# Altium PCB PCB2.PcbDoc
Units mm, origin at the board's own origin, x right, y up, seen from the top; angles counter-clockwise.
Board outline 29.77 x 25.83 mm, 2 copper layers (Top Layer, Bottom Layer); 49 components, 39 nets, 176 pads, 61 vias.
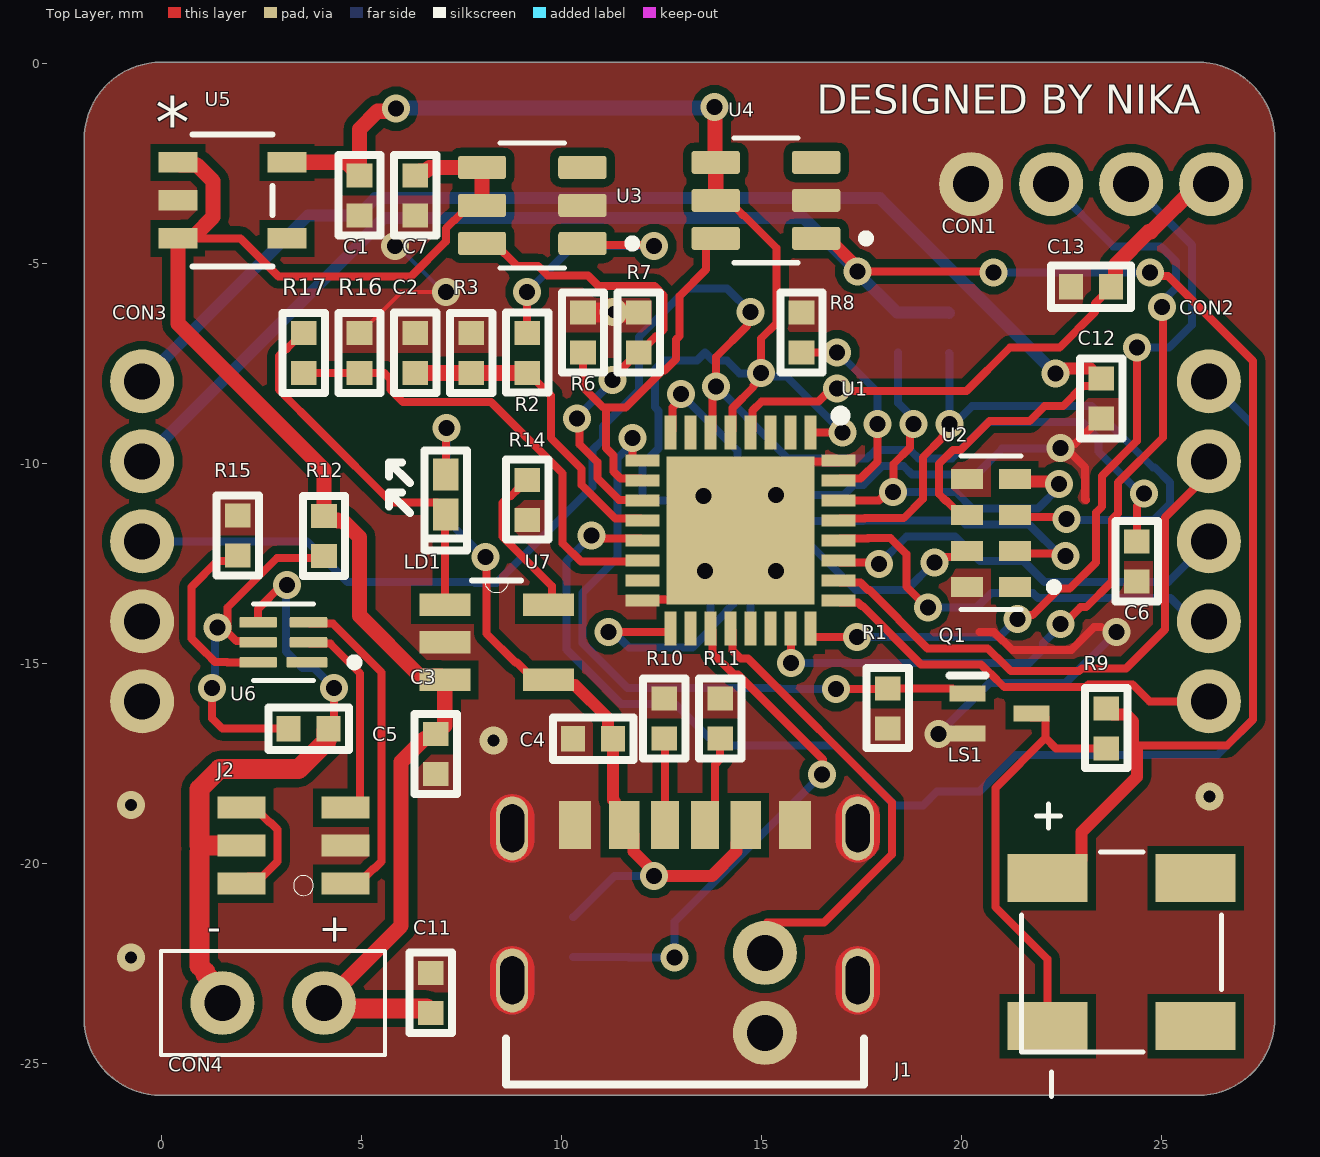
[diagram p0: Top Layer view]
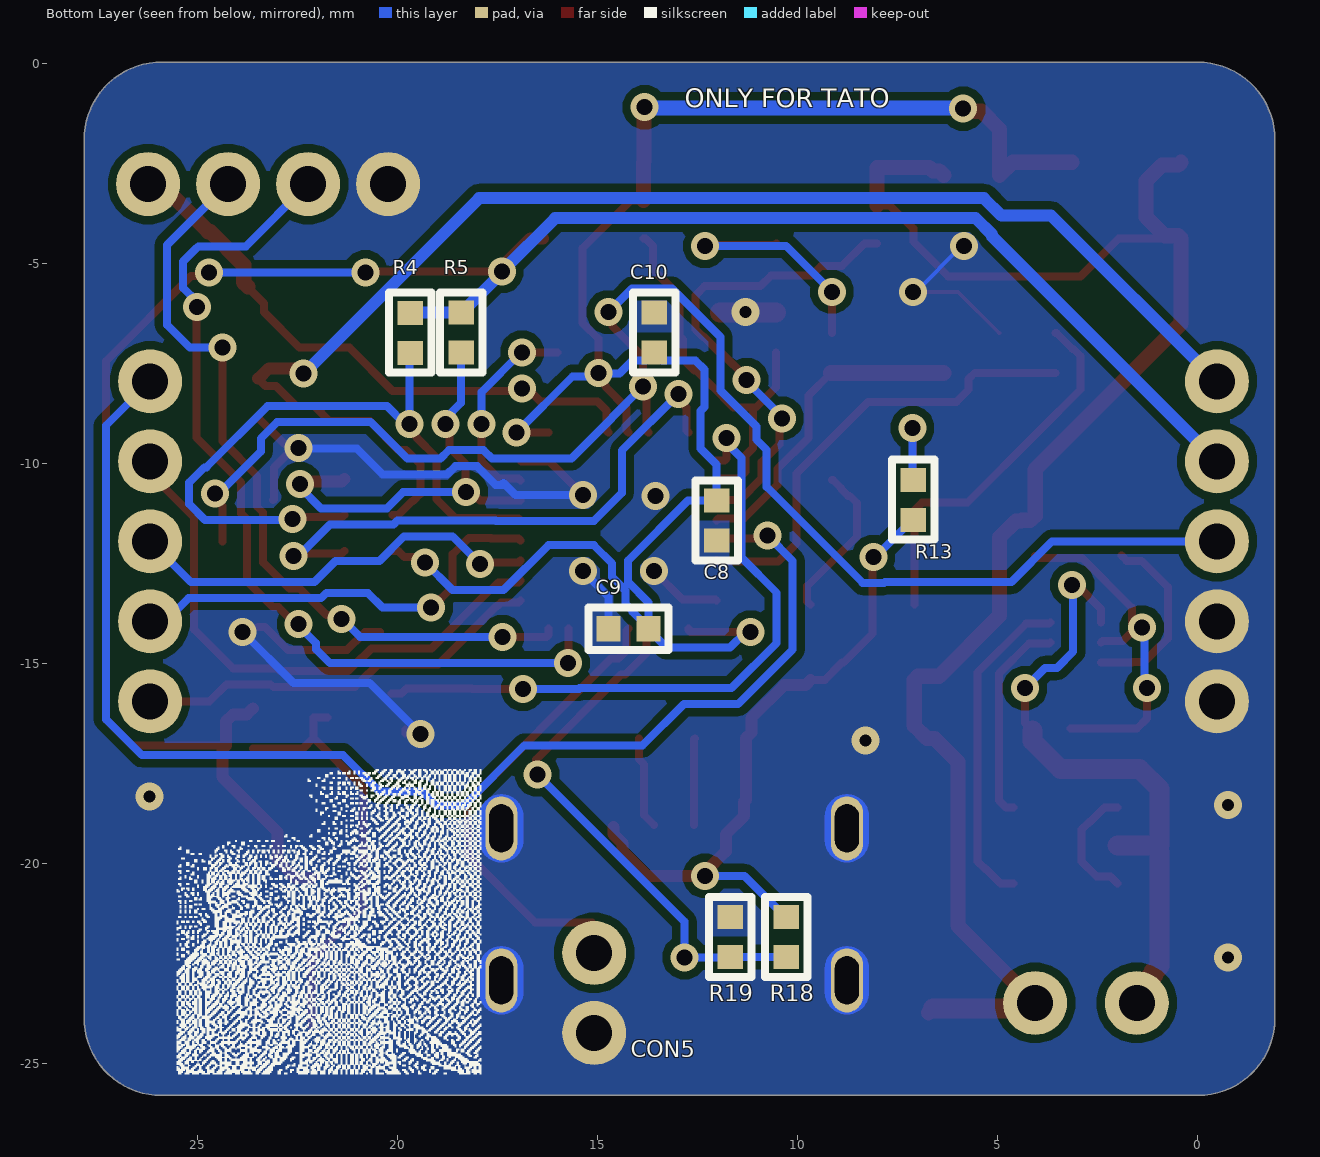
[diagram p1: Bottom Layer view, seen from below]

## Layer stack, top to bottom
Top Solder: solder mask 0.0102, Solder Resist, Dk 3.5
Top Layer: signal copper 0.0356
Dielectric 1: dielectric 0.32, FR-4, Dk 4.8
Bottom Layer: signal copper 0.0356
Bottom Solder: solder mask 0.0102, Solder Resist, Dk 3.5

## Board outline
-1.93,-23.876 ccw(c0,-23.876) 0,-25.806 25.908,-25.806 ccw(c25.908,-23.876) 27.833,-24.018 27.838,-24.003 27.838,-1.778 27.833,-1.763 ccw(c25.908,-1.905) 26.05,0.02 26.035,0.025 0,0.025 ccw(c0,-1.905) -1.93,-1.905

## Design rules (kind name [scope] priority, off if disabled: settings)
Clearance [All] p1: gap=0.2 ignorepadtopadclearanceinfootprint=TRUE
MinimumSolderMaskSliver [All] p1: minsoldermaskwidth=0.05
PolygonConnect [All] p1: connectstyle=Direct reliefconductorwidth=0.254 reliefentries=4 polygonreliefangle="90 Angle" airgapwidth=0.254
RoutingVias [All] p1: holewidth=0.7 width=1 viastyle="Through Hole" minholewidth=0.3 minwidth=0.7 maxholewidth=0.7 maxwidth=1
SilkToSilkClearance [All] p1 off: silktosilkclearance=0.254
SilkToSolderMaskClearance [IsPad] p1 off: minsilkscreentomaskgap=0.254 clearancetoexposedcopper=TRUE
SolderMaskExpansion [All] p1: expansion=0 istentingtop=FALSE
SupplyNets "Schematic Supply Nets_1" [InNet('+3')] p1: voltage=0.000
SupplyNets "Schematic Supply Nets" [InNet('GND')] p2: voltage=0.000
Width [All] p1: maxlimit=0.6 minlimit=0.1 preferedwidth=0.2
27 further rules are at their usual default settings.

## Classes and differential pairs
component class Sheet2: C4 C5 C11 CON4 J1 J2 LD1 R10 R11 R12 R13 R14 R15 R16 R17 R18 R19 U6 U7
component class Sheet1: 3 C1 C2 C3 C6 C7 C8 C9 C10 C12 C13 CON1 CON2 CON3 CON5 LS1 Q1 R1 R2 R3 R4 R5 R6 R7 R8 R9 U1 U2 U3 U4 U5

## Components (designator, comment, footprint, x,y, rotation, side; value= is the part's Value field where it differs from the comment)
C1 "CAP_0402" CAP_0402 4.953,-3.302 r90 top
C2 "CAP_0402" CAP_0402 6.35,-7.239 r270 top
C3 "CAP_0402" CAP_0402 6.858,-17.272 r90 top
C4 "CAP_0402" CAP_0402 10.795,-16.891 r0 top
C5 "CAP_0402" CAP_0402 3.683,-16.637 r180 top
C6 "CAP_0402" CAP_0402 24.384,-12.454 r90 top
C7 "CAP_0402" CAP_0402 6.35,-3.302 r90 top
C8 "CAP_0402" CAP_0402 12.028,-11.434 r90 bottom
C9 "CAP_0402" CAP_0402 14.228,-14.134 r0 bottom
C10 "CAP_0402" CAP_0402 13.589,-6.731 r90 bottom
C11 "CAP_0402" CAP_0402 6.731,-23.241 r90 top
C12 "CAP_0402" CAP_0402 23.495,-8.382 r270 top
C13 "CAP_0402" CAP_0402 23.241,-5.588 r180 top
CON1 "CON_1x4_2mm" CON_1x4_2mm 23.241,-3.048 r90 top
CON2 "CON_1x6_2mm" CON_1x5_2mm 26.214,-12.953 r0 top
CON3 "CON_1x6_2mm" CON_1x5_2mm -0.456,-12.953 r0 top
CON4 "1x4 2.54mm THT" CON_1x2_2.54MM_THT 2.794,-23.495 r270 top
CON5 "1x4 2.54mm THT" CON_1x2_2mm 15.113,-23.241 r180 bottom
J1 "USB4125-GF-A_REVA2" GCT_USB4125-GF-A_REVA2 13.089,-22.13 r0 top
J2 "FDC6305N" SSOT-6 3.302,-19.558 r90 top
LD1 "LED_0402" LED_0402 7.112,-10.787 r90 top
LS1 "Buzzer_Capacitive_5020" Buzzer_5020 24.003,-22.225 r270 top
Q1 "c" SOT50P160X80-3N 20.955,-16.256 r0 top
R1 "RES_0402" RES_0402 18.161,-16.129 r90 top
R2 "RES_0402" RES_0402 9.144,-7.239 r90 top
R3 "RES_0402" RES_0402 7.747,-7.239 r270 top
R4 "RES_0402" RES_0402 19.685,-6.739 r90 bottom
R5 "RES_0402" RES_0402 18.415,-6.731 r90 bottom
R6 "RES_0402" RES_0402 10.541,-6.731 r270 top
R7 "RES_0402" RES_0402 11.938,-6.731 r270 top
R8 "RES_0402" RES_0402 16.002,-6.731 r270 top
R9 "RES_0402" RES_0402 23.622,-16.629 r90 top
R10 "RES_0402" RES_0402 12.573,-16.383 r270 top
R11 "RES_0402" RES_0402 13.97,-16.383 r270 top
R12 "RES_0402" RES_0402 4.064,-11.819 r90 top
R13 "RES_0402" RES_0402 7.112,-10.914 r90 bottom
R14 "RES_0402" RES_0402 9.144,-10.914 r90 top
R15 "RES_0402" RES_0402 1.905,-11.811 r90 top
R16 "RES_0402" RES_0402 4.953,-7.239 r270 top
R17 "RES_0402" RES_0402 3.556,-7.239 r270 top
R18 "RES_0402" RES_0402 10.287,-21.844 r90 bottom
R19 "RES_0402" RES_0402 11.684,-21.844 r270 bottom
U1 "STM32U031K8U6" QFN50P500X500X60-33N-D 14.478,-11.684 r270 top
U2 "RV-3028-C7-32.768KHZ" "IC_RV-3028-C7-32.768KHZ-1PPM-TA-QA - duplicate" 20.736,-11.742 r180 top
U3 "TPS22860DBVR" SOT95P280X145-6N 9.271,-3.556 r180 top
U4 "TPS22860DBVR" SOT95P280X145-6N 15.113,-3.429 r180 top
U5 "TPS7A0230PDBVR" SOT23_DBV_TEX 1.778,-3.429 r0 top
U6 "BQ29700DSER" SON50P150X150X80-6N 3.048,-14.478 r180 top
U7 "MCP73831T-2ACI/OT" SOT95P280X145-5N 8.382,-14.478 r0 top

## Footprints (in the part's own frame and the unit in brackets; to place one, negate y for a bottom-side part, rotate by r counter-clockwise, add the part's x,y. Pads: shape width x height; smd on the part's side, far side on the other; paste and mask are expansions set on the pad)
Buzzer_5020 [mm]
  rect 1.2x2 smd paste+0 mask+0.102: N(1.85,-1.85) NC(-1.85,1.85) NC(1.85,1.85) P(-1.85,-1.85)
  silkscreen extent -3.7,-2.5 3.6,2.5, body extent -2.5,-1.58 2.5,3.42, height 0.75
CAP_0402 [mm] "Chip Capacitor, 2-Leads, Body 1,06x0,51mm, IPC Medium Density"
  rect 0.6x0.64 smd: 1(-0.5,0) 2(0.5,0)
  silkscreen extent -1,-0.53 1,0.53, body extent -0.55,-0.26 0.55,0.25, height 0.5
CON_1x2_2.54MM_THT [mm] "Chip Resistor, 2-Leads, Body 5,20x3,30mm, IPC Medium Density"
  round 1.6 hole 0.9: 1(0,1.27) 2(0,-1.27)
  silkscreen extent -1.3,-2.8 1.3,2.8, body extent -1,-2.5 1,2.5, height 6.3
CON_1x2_2mm [mm]
  round 1.6 hole 0.9: 1(0.025,1) 2(0.025,-1)
  body extent -0.97,-1.91 1.03,1.91, height 6.3
CON_1x4_2mm [mm]
  round 1.6 hole 0.9: 1(0.025,3) 2(0.025,1) 3(0.025,-1) 4(0.025,-3)
  body extent -0.97,-4.03 1.03,4.1, height 6.3
CON_1x5_2mm [mm]
  round 1.6 hole 0.9: 1(-0.025,5) 2(-0.025,3) 3(-0.025,1) 4(-0.025,-1) 5(-0.025,-3)
  body extent -1.02,-4.23 0.98,6.1, height 6.3
GCT_USB4125-GF-A_REVA2 [mm]
  rect 0.7x1.2 smd: A5(-0.5,3.08) B5(0.5,3.08)
  rect 0.76x1.2 smd: A9(1.52,3.08) B9(-1.52,3.08)
  rect 0.8x1.2 smd: A12(2.75,3.08) B12(-2.75,3.08)
  oval 0.8x1.6 hole 0.6 slot 1.2 at 90 deg mask+0: S1(-4.32,3) S2(4.32,3) S3(-4.32,-0.8) S4(4.32,-0.8)
  Top Layer region: -4.291,0.049 -4.263,0.047 -4.234,0.043 -4.206,0.038 -4.178,0.031 -4.15,0.023 -4.123,0.013 -4.096,0.002 -4.07,-0.01 -4.045,-0.024 -4.02,-0.039 -3.997,-0.055 -3.974,-0.073 -3.952,-0.091 -3.931,-0.111 -3.911,-0.132 -3.893,-0.154 -3.875,-0.177 -3.859,-0.2 -3.844,-0.225 -3.83,-0.25 -3.818,-0.276 -3.807,-0.303 -3.797,-0.33 -3.789,-0.358 -3.782,-0.386 -3.777,-0.414 -3.773,-0.443 -3.771,-0.471 -3.77,-0.5 -3.77,-1.1 -3.771,-1.129 -3.773,-1.157 -3.777,-1.186 -3.782,-1.214 -3.789,-1.242 -3.797,-1.27 -3.807,-1.297 -3.818,-1.324 -3.83,-1.35 -3.844,-1.375 -3.859,-1.4 -3.875,-1.423 -3.893,-1.446 -3.911,-1.468 -3.931,-1.489 -3.952,-1.509 -3.974,-1.527 -3.997,-1.545 -4.02,-1.561 -4.045,-1.576 -4.07,-1.59 -4.096,-1.602 -4.123,-1.613 -4.15,-1.623 -4.178,-1.631 -4.206,-1.638 -4.234,-1.643 -4.263,-1.647 -4.291,-1.649 -4.32,-1.65 -4.349,-1.649 -4.377,-1.647 -4.406,-1.643 -4.434,-1.638 -4.462,-1.631 -4.49,-1.623 -4.517,-1.613 -4.544,-1.602 -4.57,-1.59 -4.595,-1.576 -4.62,-1.561 -4.643,-1.545 -4.666,-1.527 -4.688,-1.509 -4.709,-1.489 -4.729,-1.468 -4.747,-1.446 -4.765,-1.423 -4.781,-1.4 -4.796,-1.375 -4.81,-1.35 -4.822,-1.324 -4.833,-1.297 -4.843,-1.27 -4.851,-1.242 -4.858,-1.214 -4.863,-1.186 -4.867,-1.157 -4.869,-1.129 -4.87,-1.1 -4.87,-0.5 -4.869,-0.471 -4.867,-0.443 -4.863,-0.414 -4.858,-0.386 -4.851,-0.358 -4.843,-0.33 -4.833,-0.303 -4.822,-0.276 -4.81,-0.25 -4.796,-0.225 -4.781,-0.2 -4.765,-0.177 -4.747,-0.154 -4.729,-0.132 -4.709,-0.111 -4.688,-0.091 -4.666,-0.073 -4.643,-0.055 -4.62,-0.039 -4.595,-0.024 -4.57,-0.01 -4.544,0.002 -4.517,0.013 -4.49,0.023 -4.462,0.031 -4.434,0.038 -4.406,0.043 -4.377,0.047 -4.349,0.049 -4.32,0.05
  Top Layer region: 4.349,0.049 4.377,0.047 4.406,0.043 4.434,0.038 4.462,0.031 4.49,0.023 4.517,0.013 4.544,0.002 4.57,-0.01 4.595,-0.024 4.62,-0.039 4.643,-0.055 4.666,-0.073 4.688,-0.091 4.709,-0.111 4.729,-0.132 4.747,-0.154 4.765,-0.177 4.781,-0.2 4.796,-0.225 4.81,-0.25 4.822,-0.276 4.833,-0.303 4.843,-0.33 4.851,-0.358 4.858,-0.386 4.863,-0.414 4.867,-0.443 4.869,-0.471 4.87,-0.5 4.87,-1.1 4.869,-1.129 4.867,-1.157 4.863,-1.186 4.858,-1.214 4.851,-1.242 4.843,-1.27 4.833,-1.297 4.822,-1.324 4.81,-1.35 4.796,-1.375 4.781,-1.4 4.765,-1.423 4.747,-1.446 4.729,-1.468 4.709,-1.489 4.688,-1.509 4.666,-1.527 4.643,-1.545 4.62,-1.561 4.595,-1.576 4.57,-1.59 4.544,-1.602 4.517,-1.613 4.49,-1.623 4.462,-1.631 4.434,-1.638 4.406,-1.643 4.377,-1.647 4.349,-1.649 4.32,-1.65 4.291,-1.649 4.263,-1.647 4.234,-1.643 4.206,-1.638 4.178,-1.631 4.15,-1.623 4.123,-1.613 4.096,-1.602 4.07,-1.59 4.045,-1.576 4.02,-1.561 3.997,-1.545 3.974,-1.527 3.952,-1.509 3.931,-1.489 3.911,-1.468 3.893,-1.446 3.875,-1.423 3.859,-1.4 3.844,-1.375 3.83,-1.35 3.818,-1.324 3.807,-1.297 3.797,-1.27 3.789,-1.242 3.782,-1.214 3.777,-1.186 3.773,-1.157 3.771,-1.129 3.77,-1.1 3.77,-0.5 3.771,-0.471 3.773,-0.443 3.777,-0.414 3.782,-0.386 3.789,-0.358 3.797,-0.33 3.807,-0.303 3.818,-0.276 3.83,-0.25 3.844,-0.225 3.859,-0.2 3.875,-0.177 3.893,-0.154 3.911,-0.132 3.931,-0.111 3.952,-0.091 3.974,-0.073 3.997,-0.055 4.02,-0.039 4.045,-0.024 4.07,-0.01 4.096,0.002 4.123,0.013 4.15,0.023 4.178,0.031 4.206,0.038 4.234,0.043 4.263,0.047 4.291,0.049 4.32,0.05
  Top Layer region: -4.291,3.849 -4.263,3.847 -4.234,3.843 -4.206,3.838 -4.178,3.831 -4.15,3.823 -4.123,3.813 -4.096,3.802 -4.07,3.79 -4.045,3.776 -4.02,3.761 -3.997,3.745 -3.974,3.727 -3.952,3.709 -3.931,3.689 -3.911,3.668 -3.893,3.646 -3.875,3.623 -3.859,3.6 -3.844,3.575 -3.83,3.55 -3.818,3.524 -3.807,3.497 -3.797,3.47 -3.789,3.442 -3.782,3.414 -3.777,3.386 -3.773,3.357 -3.771,3.329 -3.77,3.3 -3.77,2.7 -3.771,2.671 -3.773,2.643 -3.777,2.614 -3.782,2.586 -3.789,2.558 -3.797,2.53 -3.807,2.503 -3.818,2.476 -3.83,2.45 -3.844,2.425 -3.859,2.4 -3.875,2.377 -3.893,2.354 -3.911,2.332 -3.931,2.311 -3.952,2.291 -3.974,2.273 -3.997,2.255 -4.02,2.239 -4.045,2.224 -4.07,2.21 -4.096,2.198 -4.123,2.187 -4.15,2.177 -4.178,2.169 -4.206,2.162 -4.234,2.157 -4.263,2.153 -4.291,2.151 -4.32,2.15 -4.349,2.151 -4.377,2.153 -4.406,2.157 -4.434,2.162 -4.462,2.169 -4.49,2.177 -4.517,2.187 -4.544,2.198 -4.57,2.21 -4.595,2.224 -4.62,2.239 -4.643,2.255 -4.666,2.273 -4.688,2.291 -4.709,2.311 -4.729,2.332 -4.747,2.354 -4.765,2.377 -4.781,2.4 -4.796,2.425 -4.81,2.45 -4.822,2.476 -4.833,2.503 -4.843,2.53 -4.851,2.558 -4.858,2.586 -4.863,2.614 -4.867,2.643 -4.869,2.671 -4.87,2.7 -4.87,3.3 -4.869,3.329 -4.867,3.357 -4.863,3.386 -4.858,3.414 -4.851,3.442 -4.843,3.47 -4.833,3.497 -4.822,3.524 -4.81,3.55 -4.796,3.575 -4.781,3.6 -4.765,3.623 -4.747,3.646 -4.729,3.668 -4.709,3.689 -4.688,3.709 -4.666,3.727 -4.643,3.745 -4.62,3.761 -4.595,3.776 -4.57,3.79 -4.544,3.802 -4.517,3.813 -4.49,3.823 -4.462,3.831 -4.434,3.838 -4.406,3.843 -4.377,3.847 -4.349,3.849 -4.32,3.85
  Top Layer region: 4.349,3.849 4.377,3.847 4.406,3.843 4.434,3.838 4.462,3.831 4.49,3.823 4.517,3.813 4.544,3.802 4.57,3.79 4.595,3.776 4.62,3.761 4.643,3.745 4.666,3.727 4.688,3.709 4.709,3.689 4.729,3.668 4.747,3.646 4.765,3.623 4.781,3.6 4.796,3.575 4.81,3.55 4.822,3.524 4.833,3.497 4.843,3.47 4.851,3.442 4.858,3.414 4.863,3.386 4.867,3.357 4.869,3.329 4.87,3.3 4.87,2.7 4.869,2.671 4.867,2.643 4.863,2.614 4.858,2.586 4.851,2.558 4.843,2.53 4.833,2.503 4.822,2.476 4.81,2.45 4.796,2.425 4.781,2.4 4.765,2.377 4.747,2.354 4.729,2.332 4.709,2.311 4.688,2.291 4.666,2.273 4.643,2.255 4.62,2.239 4.595,2.224 4.57,2.21 4.544,2.198 4.517,2.187 4.49,2.177 4.462,2.169 4.434,2.162 4.406,2.157 4.377,2.153 4.349,2.151 4.32,2.15 4.291,2.151 4.263,2.153 4.234,2.157 4.206,2.162 4.178,2.169 4.15,2.177 4.123,2.187 4.096,2.198 4.07,2.21 4.045,2.224 4.02,2.239 3.997,2.255 3.974,2.273 3.952,2.291 3.931,2.311 3.911,2.332 3.893,2.354 3.875,2.377 3.859,2.4 3.844,2.425 3.83,2.45 3.818,2.476 3.807,2.503 3.797,2.53 3.789,2.558 3.782,2.586 3.777,2.614 3.773,2.643 3.771,2.671 3.77,2.7 3.77,3.3 3.771,3.329 3.773,3.357 3.777,3.386 3.782,3.414 3.789,3.442 3.797,3.47 3.807,3.497 3.818,3.524 3.83,3.55 3.844,3.575 3.859,3.6 3.875,3.623 3.893,3.646 3.911,3.668 3.931,3.689 3.952,3.709 3.974,3.727 3.997,3.745 4.02,3.761 4.045,3.776 4.07,3.79 4.096,3.802 4.123,3.813 4.15,3.823 4.178,3.831 4.206,3.838 4.234,3.843 4.263,3.847 4.291,3.849 4.32,3.85
  Bottom Layer region: -4.291,0.049 -4.263,0.047 -4.234,0.043 -4.206,0.038 -4.178,0.031 -4.15,0.023 -4.123,0.013 -4.096,0.002 -4.07,-0.01 -4.045,-0.024 -4.02,-0.039 -3.997,-0.055 -3.974,-0.073 -3.952,-0.091 -3.931,-0.111 -3.911,-0.132 -3.893,-0.154 -3.875,-0.177 -3.859,-0.2 -3.844,-0.225 -3.83,-0.25 -3.818,-0.276 -3.807,-0.303 -3.797,-0.33 -3.789,-0.358 -3.782,-0.386 -3.777,-0.414 -3.773,-0.443 -3.771,-0.471 -3.77,-0.5 -3.77,-1.1 -3.771,-1.129 -3.773,-1.157 -3.777,-1.186 -3.782,-1.214 -3.789,-1.242 -3.797,-1.27 -3.807,-1.297 -3.818,-1.324 -3.83,-1.35 -3.844,-1.375 -3.859,-1.4 -3.875,-1.423 -3.893,-1.446 -3.911,-1.468 -3.931,-1.489 -3.952,-1.509 -3.974,-1.527 -3.997,-1.545 -4.02,-1.561 -4.045,-1.576 -4.07,-1.59 -4.096,-1.602 -4.123,-1.613 -4.15,-1.623 -4.178,-1.631 -4.206,-1.638 -4.234,-1.643 -4.263,-1.647 -4.291,-1.649 -4.32,-1.65 -4.349,-1.649 -4.377,-1.647 -4.406,-1.643 -4.434,-1.638 -4.462,-1.631 -4.49,-1.623 -4.517,-1.613 -4.544,-1.602 -4.57,-1.59 -4.595,-1.576 -4.62,-1.561 -4.643,-1.545 -4.666,-1.527 -4.688,-1.509 -4.709,-1.489 -4.729,-1.468 -4.747,-1.446 -4.765,-1.423 -4.781,-1.4 -4.796,-1.375 -4.81,-1.35 -4.822,-1.324 -4.833,-1.297 -4.843,-1.27 -4.851,-1.242 -4.858,-1.214 -4.863,-1.186 -4.867,-1.157 -4.869,-1.129 -4.87,-1.1 -4.87,-0.5 -4.869,-0.471 -4.867,-0.443 -4.863,-0.414 -4.858,-0.386 -4.851,-0.358 -4.843,-0.33 -4.833,-0.303 -4.822,-0.276 -4.81,-0.25 -4.796,-0.225 -4.781,-0.2 -4.765,-0.177 -4.747,-0.154 -4.729,-0.132 -4.709,-0.111 -4.688,-0.091 -4.666,-0.073 -4.643,-0.055 -4.62,-0.039 -4.595,-0.024 -4.57,-0.01 -4.544,0.002 -4.517,0.013 -4.49,0.023 -4.462,0.031 -4.434,0.038 -4.406,0.043 -4.377,0.047 -4.349,0.049 -4.32,0.05
  Bottom Layer region: 4.349,0.049 4.377,0.047 4.406,0.043 4.434,0.038 4.462,0.031 4.49,0.023 4.517,0.013 4.544,0.002 4.57,-0.01 4.595,-0.024 4.62,-0.039 4.643,-0.055 4.666,-0.073 4.688,-0.091 4.709,-0.111 4.729,-0.132 4.747,-0.154 4.765,-0.177 4.781,-0.2 4.796,-0.225 4.81,-0.25 4.822,-0.276 4.833,-0.303 4.843,-0.33 4.851,-0.358 4.858,-0.386 4.863,-0.414 4.867,-0.443 4.869,-0.471 4.87,-0.5 4.87,-1.1 4.869,-1.129 4.867,-1.157 4.863,-1.186 4.858,-1.214 4.851,-1.242 4.843,-1.27 4.833,-1.297 4.822,-1.324 4.81,-1.35 4.796,-1.375 4.781,-1.4 4.765,-1.423 4.747,-1.446 4.729,-1.468 4.709,-1.489 4.688,-1.509 4.666,-1.527 4.643,-1.545 4.62,-1.561 4.595,-1.576 4.57,-1.59 4.544,-1.602 4.517,-1.613 4.49,-1.623 4.462,-1.631 4.434,-1.638 4.406,-1.643 4.377,-1.647 4.349,-1.649 4.32,-1.65 4.291,-1.649 4.263,-1.647 4.234,-1.643 4.206,-1.638 4.178,-1.631 4.15,-1.623 4.123,-1.613 4.096,-1.602 4.07,-1.59 4.045,-1.576 4.02,-1.561 3.997,-1.545 3.974,-1.527 3.952,-1.509 3.931,-1.489 3.911,-1.468 3.893,-1.446 3.875,-1.423 3.859,-1.4 3.844,-1.375 3.83,-1.35 3.818,-1.324 3.807,-1.297 3.797,-1.27 3.789,-1.242 3.782,-1.214 3.777,-1.186 3.773,-1.157 3.771,-1.129 3.77,-1.1 3.77,-0.5 3.771,-0.471 3.773,-0.443 3.777,-0.414 3.782,-0.386 3.789,-0.358 3.797,-0.33 3.807,-0.303 3.818,-0.276 3.83,-0.25 3.844,-0.225 3.859,-0.2 3.875,-0.177 3.893,-0.154 3.911,-0.132 3.931,-0.111 3.952,-0.091 3.974,-0.073 3.997,-0.055 4.02,-0.039 4.045,-0.024 4.07,-0.01 4.096,0.002 4.123,0.013 4.15,0.023 4.178,0.031 4.206,0.038 4.234,0.043 4.263,0.047 4.291,0.049 4.32,0.05
  Bottom Layer region: -4.291,3.849 -4.263,3.847 -4.234,3.843 -4.206,3.838 -4.178,3.831 -4.15,3.823 -4.123,3.813 -4.096,3.802 -4.07,3.79 -4.045,3.776 -4.02,3.761 -3.997,3.745 -3.974,3.727 -3.952,3.709 -3.931,3.689 -3.911,3.668 -3.893,3.646 -3.875,3.623 -3.859,3.6 -3.844,3.575 -3.83,3.55 -3.818,3.524 -3.807,3.497 -3.797,3.47 -3.789,3.442 -3.782,3.414 -3.777,3.386 -3.773,3.357 -3.771,3.329 -3.77,3.3 -3.77,2.7 -3.771,2.671 -3.773,2.643 -3.777,2.614 -3.782,2.586 -3.789,2.558 -3.797,2.53 -3.807,2.503 -3.818,2.476 -3.83,2.45 -3.844,2.425 -3.859,2.4 -3.875,2.377 -3.893,2.354 -3.911,2.332 -3.931,2.311 -3.952,2.291 -3.974,2.273 -3.997,2.255 -4.02,2.239 -4.045,2.224 -4.07,2.21 -4.096,2.198 -4.123,2.187 -4.15,2.177 -4.178,2.169 -4.206,2.162 -4.234,2.157 -4.263,2.153 -4.291,2.151 -4.32,2.15 -4.349,2.151 -4.377,2.153 -4.406,2.157 -4.434,2.162 -4.462,2.169 -4.49,2.177 -4.517,2.187 -4.544,2.198 -4.57,2.21 -4.595,2.224 -4.62,2.239 -4.643,2.255 -4.666,2.273 -4.688,2.291 -4.709,2.311 -4.729,2.332 -4.747,2.354 -4.765,2.377 -4.781,2.4 -4.796,2.425 -4.81,2.45 -4.822,2.476 -4.833,2.503 -4.843,2.53 -4.851,2.558 -4.858,2.586 -4.863,2.614 -4.867,2.643 -4.869,2.671 -4.87,2.7 -4.87,3.3 -4.869,3.329 -4.867,3.357 -4.863,3.386 -4.858,3.414 -4.851,3.442 -4.843,3.47 -4.833,3.497 -4.822,3.524 -4.81,3.55 -4.796,3.575 -4.781,3.6 -4.765,3.623 -4.747,3.646 -4.729,3.668 -4.709,3.689 -4.688,3.709 -4.666,3.727 -4.643,3.745 -4.62,3.761 -4.595,3.776 -4.57,3.79 -4.544,3.802 -4.517,3.813 -4.49,3.823 -4.462,3.831 -4.434,3.838 -4.406,3.843 -4.377,3.847 -4.349,3.849 -4.32,3.85
  Bottom Layer region: 4.349,3.849 4.377,3.847 4.406,3.843 4.434,3.838 4.462,3.831 4.49,3.823 4.517,3.813 4.544,3.802 4.57,3.79 4.595,3.776 4.62,3.761 4.643,3.745 4.666,3.727 4.688,3.709 4.709,3.689 4.729,3.668 4.747,3.646 4.765,3.623 4.781,3.6 4.796,3.575 4.81,3.55 4.822,3.524 4.833,3.497 4.843,3.47 4.851,3.442 4.858,3.414 4.863,3.386 4.867,3.357 4.869,3.329 4.87,3.3 4.87,2.7 4.869,2.671 4.867,2.643 4.863,2.614 4.858,2.586 4.851,2.558 4.843,2.53 4.833,2.503 4.822,2.476 4.81,2.45 4.796,2.425 4.781,2.4 4.765,2.377 4.747,2.354 4.729,2.332 4.709,2.311 4.688,2.291 4.666,2.273 4.643,2.255 4.62,2.239 4.595,2.224 4.57,2.21 4.544,2.198 4.517,2.187 4.49,2.177 4.462,2.169 4.434,2.162 4.406,2.157 4.377,2.153 4.349,2.151 4.32,2.15 4.291,2.151 4.263,2.153 4.234,2.157 4.206,2.162 4.178,2.169 4.15,2.177 4.123,2.187 4.096,2.198 4.07,2.21 4.045,2.224 4.02,2.239 3.997,2.255 3.974,2.273 3.952,2.291 3.931,2.311 3.911,2.332 3.893,2.354 3.875,2.377 3.859,2.4 3.844,2.425 3.83,2.45 3.818,2.476 3.807,2.503 3.797,2.53 3.789,2.558 3.782,2.586 3.777,2.614 3.773,2.643 3.771,2.671 3.77,2.7 3.77,3.3 3.771,3.329 3.773,3.357 3.777,3.386 3.782,3.414 3.789,3.442 3.797,3.47 3.807,3.497 3.818,3.524 3.83,3.55 3.844,3.575 3.859,3.6 3.875,3.623 3.893,3.646 3.911,3.668 3.931,3.689 3.952,3.709 3.974,3.727 3.997,3.745 4.02,3.761 4.045,3.776 4.07,3.79 4.096,3.802 4.123,3.813 4.15,3.823 4.178,3.831 4.206,3.838 4.234,3.843 4.263,3.847 4.291,3.849 4.32,3.85
  silkscreen extent -4.47,-3.4 4.47,-2.25, body extent -4.6,-3.17 4.34,3.72, height 3.27
"IC_RV-3028-C7-32.768KHZ-1PPM-TA-QA - duplicate" [mm]
  rect 0.8x0.5 smd: 1(-0.6,1.35) 2(-0.6,0.45) 3(-0.6,-0.45) 4(-0.6,-1.35) 5(0.6,-1.35) 6(0.6,-0.45) 7(0.6,0.45) 8(0.6,1.35)
  silkscreen extent -1.68,-1.92 0.75,1.92
LED_0402 [mm] "Chip Capacitor, 2-Leads, Body 1,53x0,77mm, IPC Medium Density"
  rect 0.8x0.64 smd: 1(-0.5,0) 2(0.5,0)
  silkscreen extent -1.4,-0.53 1.1,1.42, body extent -0.55,-0.25 0.55,0.26, height 0.5
QFN50P500X500X60-33N-D [mm]
  rect 0.85x0.3 smd: 1(-2.45,1.75) 2(-2.45,1.25) 3(-2.45,0.75) 4(-2.45,0.25) 5(-2.45,-0.25) 6(-2.45,-0.75) 7(-2.45,-1.25) 8(-2.45,-1.75) 17(2.45,-1.75) 18(2.45,-1.25) 19(2.45,-0.75) 20(2.45,-0.25) 21(2.45,0.25) 22(2.45,0.75) 23(2.45,1.25) 24(2.45,1.75)
  rect 0.3x0.85 smd: 9(-1.75,-2.45) 10(-1.25,-2.45) 11(-0.75,-2.45) 12(-0.25,-2.45) 13(0.25,-2.45) 14(0.75,-2.45) 15(1.25,-2.45) 16(1.75,-2.45) 25(1.75,2.45) 26(1.25,2.45) 27(0.75,2.45) 28(0.25,2.45) 29(-0.25,2.45) 30(-0.75,2.45) 31(-1.25,2.45) 32(-1.75,2.45)
  rect 3.7x3.7 smd: 33(0,0)
  silkscreen extent -3,2.38 -2.75,2.63
RES_0402 [mm]
  rect 0.6x0.64 smd: 1(-0.5,0) 2(0.5,0)
  silkscreen extent -1,-0.53 1,0.53, body extent -0.55,-0.26 0.55,0.25, height 0.5
SON50P150X150X80-6N [mm]
  rrect25% 1.02x0.27 smd: 1(-0.59,0.5)
  rrect25% 0.94x0.27 smd: 2(-0.63,0) 3(-0.63,-0.5) 4(0.63,-0.5) 5(0.63,0) 6(0.63,0.5)
  silkscreen extent -1.88,-0.95 0.75,0.95, body extent -0.75,-0.75 0.75,0.75, height 0.8
SOT23_DBV_TEX [mil]
  rect 38.28x20 smd paste+0 mask+0: 1(-53.64,37.4) 2(-53.64,0) 3(-53.64,-37.4) 4(53.64,-37.4) 5(53.64,37.4)
  silkscreen extent -40,-65 40,65, body extent -59,-60 59,60, height 57
SOT50P160X80-3N [mm]
  rect 0.9x0.4 smd: 1(-0.8,0.5) 2(-0.8,-0.5) 3(0.8,0)
  silkscreen extent -1.25,0.95 -0.35,0.95, body extent -0.8,-0.8 0.8,0.8, height 0.8
SOT95P280X145-5N [mil]
  rect 50x22 smd: 1(-51,37) 2(-51,0) 3(-51,-37) 4(51,-37) 5(51,37)
  silkscreen extent -24,49 24,61, body extent -53,-57 53,57, height 57
SOT95P280X145-6N [mm]
  rrect25% 1.21x0.58 smd: 1(-1.255,0.95) 2(-1.255,0) 3(-1.255,-0.95) 4(1.255,-0.95) 5(1.255,0) 6(1.255,0.95)
  silkscreen extent -2.6,-1.56 0.8,1.56, body extent -1.4,-1.45 1.4,1.45, height 1.45
SSOT-6 [mm]
  rect 0.55x1.2 smd: 1(-0.95,-1.3) 2(0,-1.3) 3(0.95,-1.3) 4(0.95,1.3) 5(0,1.3) 6(-0.95,1.3)
  silkscreen extent -1.25,-0.5 -0.75,0, body extent -1.38,-1.48 1.38,1.48, height 1.1

## Part data
CON2 CON3: library part CON_1x5_2mm, "CON_1x5_2mm"
CON4: library part CON_1x2_2.54mm_THT, "CON_1x2_2.54mm_THT", note="any manufacturer", val="1x4 2.54mm THT"
CON5: library part CON_1x2_2.0mm, "CON_1x2_2.54mm_THT", note="any manufacturer", val="1x4 2.54mm THT"
J1: Package=None, Availability=Unavailable, MP=USB4125-GF-A_REVA2, Price=None
J2: "Mosfet Array 2 N-Channel (Dual) 20V 2.7A 700mW Surface Mount SuperSOTâ„¢-6", Package="TSOT-23-6 ON Semiconductor", Check_prices=https://www.snapeda.com/parts/FDC6305N/Onsemi/view-part/?ref=eda, MF="ON Semiconductor", MP=FDC6305N, SnapEDA_Link=https://www.snapeda.com/parts/FDC6305N/Onsemi/view-part/?ref=snap
LS1: "Buzzers Transducer, Externally Driven Magnetic 3 V 30mA 4kHz 75dB @ 3V, 10cm Surface Mount Solder Pads", Package=Package, Check_prices=https://www.snapeda.com/parts/CMT-0502-03-SMT-TR/Same+Sky/view-part/?ref=eda, MF="Same Sky", MP=CMT-0502-03-SMT-TR, SnapEDA_Link=https://www.snapeda.com/parts/CMT-0502-03-SMT-TR/Same+Sky/view-part/?ref=snap
Q1: library part DMG1012T-7, "MOSFET N-Channel 20V 0.63A SOT523", Package="SOT-523 Diodes Inc.", Check_prices=https://www.snapeda.com/parts/DMG1012T-7/Diodes+Inc./view-part/?ref=eda, MF="Diodes Inc.", MP=DMG1012T-7, SnapEDA_Link=https://www.snapeda.com/parts/DMG1012T-7/Diodes+Inc./view-part/?ref=snap
U1: "Ultra-low-power features (ultra-low-power devices)  1.71 V to 3.6 V power supply  -40 C to 85/125 C temperature range  VBAT mode: 130 nA (with RTC and 9 x 32-bit backup registers)  Shutdown mode (4 wake-up pins): 16 nA  Standby mode (4 wake-up pins): 160 nA with RTC, 30 nA without RTC  Stop 2 mode: 630 nA with RTC, 515 nA without RTC  Run mode (LDO mode): 52 uA/MHz  Batch acquisition mode (BAM)  4 us wake-up from Stop mode  Brownout reset (BOR)", Manufacturer_Name=STMicroelectronics, Mouser Part Number=511-STM32U031K8U6, Arrow Part Number=STM32U031K8U6, Arrow Price/Stock=https://www.arrow.com/en/products/stm32u031k8u6/stmicroelectronics.html?utm_currency=USD&region=nac, Datasheet Link=https://www.st.com/resource/en/datasheet/stm32u031f4.pdf, Geometry.Height=0.6mm, Manufacturer_Part_Number=STM32U031K8U6, Mouser Price/Stock=https://www.mouser.co.uk/ProductDetail/STMicroelectronics/STM32U031K8U6?qs=dbcCsuKDzFUeNQ2GzBLCmw%3D%3D
U2: library part RV-3028-C7-32.768KHZ-1PPM-TA-QA, "Extreme Low Power RTC Module", Package=None, Availability=Unavailable, MF="{'manufacturer': u'Micro Crystal'}", MP=RV-3028-C7-32.768KHZ-1PPM-TA-QA, Price=None
U3 U4: "0.73-â„", Package="SOT-23-6 Texas Instruments", Check_prices=https://www.snapeda.com/parts/TPS22860DBVR/Texas+Instruments/view-part/?ref=eda, MF="Texas Instruments", MP=TPS22860DBVR, SnapEDA_Link=https://www.snapeda.com/parts/TPS22860DBVR/Texas+Instruments/view-part/?ref=snap
U5: "200mA, nanopower-IQ (25 nA), low-dropout (LDO) voltage regulator with enable 5-SOT-23 -40 to 125", Manufacturer_Name="Texas Instruments", Copyright="Copyright (C) 2026 Ultra Librarian. All rights reserved.", Manufacturer_Part_Number=TPS7A0230PDBVR, RefDes=RefDes, Type=Type
U6: "Li-Ion/Li Polymer Advanced Single-Cell Battery Protector IC Family 6-WSON -40 to 85", Package="WSON-6 Texas Instruments", Availability=Good, MF="Texas Instruments", MP=BQ29700DSER, Price=None, Purchase-URL=https://pricing.snapeda.com/search/part/BQ29700DSER/?ref=eda, SnapEDA_Link=https://www.snapeda.com/parts/BQ29700DSER/Texas%20Instruments/view-part/535836/?ref=snap
U7: "Charger IC Lithium Ion/Polymer SOT-23-5", Package="SOT-23 Microchip", Availability="In Stock", Check_prices=https://www.snapeda.com/parts/MCP73831T-2ACI/OT/Microchip/view-part/?ref=eda, MF=Microchip, MP=MCP73831T-2ACI/OT, Price=None, Purchase-URL=https://pricing.snapeda.com/search/part/MCP73831T-2ACI/OT/?ref=eda, SnapEDA_Link=https://www.snapeda.com/parts/MCP73831T-2ACI/OT/Microchip/view-part/?ref=snap
C1 C3 C5 C6 C9 C10 C12 C13: val=100n
C2: val=10n
C4 C8 C11: val=4.7u
C7: val=1u
R1 R6 R7: val=1M
R2 R3 R16 R17 R18 R19: val=100k
R4 R5: val=4.7k
R8: val=10k
R9 R13: val=1k
R10 R11: val=5.1k
R12: val=330
R14: val=62k
R15: val=2.2k

## Via types
v1: diameter 0.7, hole 0.4, Top Layer to Bottom Layer, 56 vias
v2: diameter 0.7, hole 0.3, Top Layer to Bottom Layer, 5 vias

## Nets (pads, with @x,y where several pads share a name; then routed paths per layer and width w, separated by ;. In a path a pad name is that pad's centre, name@x,y a point inside that pad or via, vN(x,y) a via of type N, cw(c..) or ccw(c..) an arc to the next point about the centre after c; other vN are vias at no path point)
5V_DETECT: R18.1 R19.2 U1.19 | length 13.5
  Top Layer w0.2: U1.19 13.778,-14.184 13.778,-14.749 14.312,-15.283 14.414,-15.283 16.539,-17.408 16.539,-17.751 v1(16.51,-17.78)
  Bottom Layer w0.2: R18.1 R19.2 11.692,-22.352 v1(12.827,-22.352) 12.827,-21.463 v1(16.51,-17.78)
+3: C1.2 C8.2 C9.1 C10.1 U1.1 U1.5 U1.17 U2.7 U4.4 U4.5 U5.5 | length 49.5
  Top Layer w0.2: v1(11.176,-14.224) 12.678,-14.224 12.728,-14.174 U1.17 ; U4.5 14.173,-3.429 14.533,-3.789 14.545,-3.789 15.382,-4.626 15.382,-5.954 15.382,-6.492 14.986,-6.888 14.986,-7.882 14.808,-8.06 14.808,-8.089 14.278,-8.619 14.278,-9.184 U1.5 ; U1.1 v1(17.034,-9.234) ; v1(19.324,-12.478) 19.459,-12.478 19.595,-12.342 19.836,-12.342 19.986,-12.192 U2.7
  Top Layer w0.381: U5.5 4.63,-2.479 C1.2 4.953,-1.651 5.405,-1.199 5.801,-1.199 v1(5.862,-1.138) ; v1(13.825,-1.101) 13.842,-1.117 13.842,-2.463 U4.4 U4.5
  Bottom Layer w0.2: v1(11.176,-14.224) 11.311,-14.224 11.692,-14.605 13.277,-14.605 13.728,-14.154 C9.1@13.728,-14.114 ; v1(17.034,-9.234) 15.636,-7.836 15.075,-7.836 14.996,-7.757 14.457,-7.757 14.135,-7.435 14.039,-7.435 14.034,-7.43 13.788,-7.43 C10.1 13.389,-7.431 12.561,-7.431 12.334,-7.658 12.334,-8.599 12.428,-8.693 12.428,-9.634 12.028,-10.034 C8.2 12.742,-10.934 14.239,-12.431 14.239,-12.969 13.728,-13.48 C9.1@13.728,-14.114 ; v1(19.324,-12.478) 18.628,-13.174 17.357,-13.174 16.233,-12.05 15.098,-12.05 14.639,-12.509 14.639,-12.844 14.304,-13.179 14.304,-13.514 14.128,-13.69 14.128,-13.714 C9.1@13.728,-14.114
  Bottom Layer w0.381: v1(5.862,-1.138) 5.88,-1.119 13.807,-1.119 v1(13.825,-1.101)
  other v1: 14.986,-7.747
BOOT0: R8.2 U1.31 | length 5.2
  Top Layer w0.2: R8.2 16.005,-7.228 v1(16.891,-7.228) ; U1.31 16.978,-10.384 17.477,-10.384 17.907,-9.954 v1(17.907,-9.017)
  Bottom Layer w0.2: v1(16.891,-7.228) 16.91,-7.228 17.907,-8.225 v1(17.907,-9.017)
BTN1_2: C6.2 CON3.3 U1.6 | length 38.1
  Top Layer w0.2: U1.6 13.778,-9.184 13.778,-8.173 13.87,-8.081 13.87,-7.339 14.636,-6.573 14.636,-6.319 v1(14.732,-6.223) ; C6.2 24.384,-11.067 24.564,-10.887 v1(24.564,-10.752)
  Bottom Layer w0.2: CON3.3 3.64,-11.953 4.656,-12.969 7.816,-12.969 7.838,-12.99 8.376,-12.99 10.776,-10.59 10.776,-9.671 11.034,-9.413 11.034,-9.08 11.934,-8.18 11.934,-6.842 13.145,-5.631 14.14,-5.631 v1(14.732,-6.223) ; v1(13.865,-8.085) 13.874,-8.085 14.645,-8.856 14.645,-8.872 15.657,-9.884 17.644,-9.884 17.853,-9.675 18.723,-9.675 18.932,-9.884 19.759,-9.884 20.675,-8.969 23.012,-8.969 23.423,-9.38 23.423,-9.707 24.468,-10.752 v1(24.564,-10.752)
BTN2: CON2.5 U1.25 | length 10.4
  Top Layer w0.2: U1.25 16.978,-13.484 17.412,-13.484 17.502,-13.574 17.534,-13.574 18.989,-15.029 20.491,-15.029 20.718,-15.256 20.729,-15.256 21.073,-15.599 23.107,-15.599 23.178,-15.529 24.282,-15.529 24.706,-15.953 CON2.5
BUZZER: Q1.1 R1.2 U1.9 | length 16.6
  Top Layer w0.2: v1(11.778,-9.365) 11.778,-9.884 11.828,-9.934 U1.9 ; v1(16.869,-15.65) 18.14,-15.65 R1.2 19.778,-15.629 19.905,-15.756 Q1.1
  Bottom Layer w0.2: v1(11.778,-9.365) 11.778,-9.5 11.408,-9.87 11.408,-12.358 10.526,-13.24 10.526,-14.493 11.654,-15.621 15.449,-15.621 15.472,-15.644 16.864,-15.644 v1(16.869,-15.65)
CELL-: C5.1 CON4.2 J2.5 U6.4 | length 16.1
  Top Layer w0.2: U6.4 2.418,-13.642 3.018,-13.041 v1(3.138,-13.041) ; C5.1@4.133,-16.687 4.32,-16.5 v1(4.32,-15.626)
  Top Layer w0.5: 0.952,-19.717 0.952,-22.571 1.104,-22.723 1.104,-22.777 1.524,-23.197 CON4.2 ; J2.5 0.952,-19.558 0.952,-18.147 1.454,-17.645 3.431,-17.645 4.133,-16.943 C5.1@4.133,-16.687
  Bottom Layer w0.2: v1(3.138,-13.041) 3.112,-13.068 3.112,-14.711 3.521,-15.12 3.815,-15.12 v1(4.32,-15.626)
D/C: CON2.3 U1.27 | length 10.5
  Top Layer w0.2: U1.27 16.973,-12.479 17.892,-12.479 v1(17.937,-12.524)
  Bottom Layer w0.2: v1@17.937,-12.523 18.632,-11.828 19.841,-11.828 20.459,-12.446 21.556,-12.446 22.079,-12.969 25.173,-12.969 CON2.3
GND: C1.1 C2.1 C3.1 C4.1 C6.1 C7.1 C8.1 C9.2 C10.2 C11.2 C12.2 C13.2 CON1.1 CON3.4 CON3.5 CON5.2 J1.A12 J1.B12 J1.S1 J1.S2 J1.S3 J1.S4 J2.2 Q1.2 R1.1 R3.1 R6.1 R7.1 R8.1 R10.1 R11.1 R14.1 R15.2 R16.1 R19.1 U1.16 U1.32 U1.33 U2.5 U2.8 U3.2 U4.2 U5.2 U7.2 | length 31.4
  Top Layer w0.1: R16.1 4.973,-6.739 5.997,-5.715 v1(7.112,-5.715)
  Top Layer w0.2: U1.16 12.053,-13.409 12.88,-13.409 v1(13.589,-12.7) ; v1(15.367,-10.795) 16.203,-9.959 16.903,-9.959 U1.32 ; v1(19.431,-16.764) 19.435,-16.76 19.805,-16.76 Q1.2@19.805,-16.656 ; 20.447,-14.224 20.818,-14.224 21.05,-14.456 21.061,-14.456 21.274,-14.669 22.748,-14.669 23.32,-14.097 23.495,-14.097 ; v1(22.48,-9.619) 22.607,-9.619 23.096,-10.107 23.096,-10.904 23.114,-10.922 ; v1@22.496,-9.635 22.608,-9.523 22.834,-9.523 23.475,-8.882 C12.2
  Top Layer w0.5: R6.1 10.545,-6.227 11.299,-6.227 v2(11.303,-6.223) 11.307,-6.227 11.934,-6.227 R7.1
  Bottom Layer w0.1: v1(5.842,-4.572) 5.905,-4.572 7.048,-5.715 v1(7.112,-5.715)
  Bottom Layer w0.2: C9.2 14.728,-13.339 v1(15.367,-12.7) ; v1(15.367,-10.795) 17.057,-10.795 17.355,-10.497 17.399,-10.541 17.552,-10.541 18.019,-10.075 18.557,-10.075 18.767,-10.284 20.374,-10.284 21.02,-9.639 22.46,-9.639 v1(22.48,-9.619) ; v1(19.431,-16.764) 20.701,-15.494 22.606,-15.494 v1(23.876,-14.224)
  other v1: 13.559,-10.825
  other v2: -0.762,-22.352 -0.762,-18.542 26.208,-18.335 8.301,-16.938
I2C_SCL: R4.1 U1.29 U2.3 | length 17.4
  Top Layer w0.2: U1.29 16.978,-11.384 17.575,-11.384 17.584,-11.375 18.557,-11.375 19.036,-10.896 19.036,-9.852 19.529,-9.359 19.529,-9.33 19.707,-9.152 v1(19.707,-9.017) ; U2.3 21.39,-11.346 22.572,-11.346 v1(22.626,-11.4)
  Bottom Layer w0.2: R4.1 19.707,-7.261 v1(19.707,-9.017) 19.823,-9.017 20.271,-8.569 23.251,-8.569 24.784,-10.102 24.833,-10.102 25.214,-10.483 25.214,-11.021 24.816,-11.419 22.645,-11.419 v1(22.626,-11.4)
I2C_SDA: R5.1 U1.30 U2.4 | length 11.1
  Top Layer w0.2: U1.30 17.943,-10.934 18.153,-10.725 v1(18.288,-10.725) ; v1@18.307,-10.725 18.307,-10.015 18.711,-9.611 18.711,-9.113 v1(18.807,-9.017)
  Top Layer w0.3: U2.4 21.399,-10.455 22.383,-10.455 v1(22.446,-10.518)
  Bottom Layer w0.2: v1(18.288,-10.725) 19.869,-10.725 20.274,-11.129 21.917,-11.129 22.446,-10.6 v1(22.446,-10.518) ; R5.1 18.415,-8.49 18.807,-8.882 v1(18.807,-9.017)
NetC5_2: C5.2 R12.1 U6.5 | length 8.8
  Top Layer w0.2: v1(1.27,-15.621) 1.27,-16.383 1.524,-16.637 C5.2 ; U6.5 2.383,-14.443 1.874,-14.443 1.648,-14.217 1.648,-13.612 2.896,-12.365 4.018,-12.365 R12.1
  Bottom Layer w0.2: v1(1.27,-15.621) 1.334,-15.557 1.334,-14.31 1.399,-14.246 v1(1.399,-14.111)
NetJ1_A5: J1.A5 R10.2 | length 2.2
  Top Layer w0.2: R10.2 12.589,-16.899 J1.A5
NetJ1_B5: J1.B5 R11.2 | length 2.3
  Top Layer w0.2: J1.B5 13.839,-18.8 13.839,-17.53 13.97,-17.399 R11.2
NetJ2_1: J2.1 U6.3 | length 8.2
  Top Layer w0.2: U6.3 3.713,-14.013 4.288,-14.013 5.502,-15.227 5.502,-19.957 5.326,-20.133 5.302,-20.133 4.927,-20.508 J2.1
NetJ2_3: J2.3 U6.2 | length 5.2
  Top Layer w0.2: U6.2 3.713,-14.513 4.222,-14.513 4.97,-15.26 4.97,-18.433 4.795,-18.608 J2.3
NetJ2_4: J2.4 J2.6 | length 3.1
  Top Layer w0.2: J2.6 2.177,-20.333 2.526,-20.333 2.902,-19.957 2.902,-19.159 2.726,-18.983 2.702,-18.983 2.327,-18.608 J2.4
NetLD1_1: LD1.1 R17.1 U7.1 | length 9.5
  Top Layer w0.2: R17.1 3.536,-6.739 3.136,-7.139 3.112,-7.139 2.936,-7.315 2.936,-8.163 3.979,-9.206 5.76,-10.987 6.892,-10.987 7.087,-11.182 U7.1
NetLD1_2: LD1.2 R13.2 | length 2.5
  Top Layer w0.2: LD1.2 7.112,-9.139 v1(7.133,-9.118)
  Bottom Layer w0.2: R13.2 7.133,-10.393 v1(7.133,-9.118)
NetLS1_N: LS1.N Q1.3 R9.1 | length 10.8
  Top Layer w0.2: Q1.3@21.755,-16.356 22.105,-16.356 22.105,-16.866 ; LS1.N 22.153,-22.399 20.853,-21.099 20.853,-18.118 22.105,-16.866 ; R9.1 22.368,-17.129 22.105,-16.866
NetR2_2: R2.2 U3.1 | length 6.5
  Top Layer w0.2: R2.2 v1(9.144,-5.715) ; U3.1 10.559,-4.539 12.286,-4.539 v1(12.319,-4.572)
  Bottom Layer w0.2: v1(9.144,-5.715) 10.287,-4.572 v1(12.319,-4.572)
NetR14_2: R14.2 U7.5 | length 4
  Top Layer w0.2: R14.2 9.124,-10.414 8.924,-10.614 8.924,-10.634 8.744,-10.814 8.7,-10.814 8.524,-10.99 8.524,-11.838 9.762,-13.076 9.762,-13.454 U7.5
NetR15_1: R15.1 U6.6 | length 4.7
  Top Layer w0.2: R15.1 1.775,-12.441 1.402,-12.441 0.749,-13.094 0.749,-14.38 1.13,-14.761 1.131,-14.761 1.342,-14.971 1.641,-14.971 1.648,-14.978 U6.6
NRST: C13.1 CON1.4 U1.4 | length 14.8
  Top Layer w0.2: U1.4 14.778,-9.184 14.778,-8.685 15.009,-8.454 16.429,-8.454 16.756,-8.128 v1(16.891,-8.128) 16.954,-8.191 20.13,-8.191 21.209,-7.112 22.453,-7.112 23.341,-6.224 23.341,-6.008 23.741,-5.608 C13.1
  Top Layer w0.381: C13.1 23.85,-5.479 23.85,-5.044 24.681,-4.213 24.734,-4.213 25.925,-3.023 CON1.4
PA2_INT: U1.8 U2.2 | length 14.3
  Top Layer w0.2: U1.8 12.778,-9.184 12.778,-8.608 12.984,-8.402 v1(12.984,-8.267) ; U2.2 21.399,-12.255 22.543,-12.255 v1(22.606,-12.319)
  Bottom Layer w0.2: v1(12.984,-8.267) 14.397,-9.68 14.397,-10.744 15.098,-11.445 17.544,-11.445 17.561,-11.428 20.007,-11.428 20.108,-11.529 21.693,-11.529 22.483,-12.319 v1(22.606,-12.319)
PA4_ON: R6.2 U1.10 U4.6 | length 9.9
  Top Layer w0.2: R6.2 10.541,-8.103 11.051,-8.613 11.116,-8.613 ; U1.10 11.978,-10.384 11.479,-10.384 11.303,-10.208 11.303,-9.809 11.116,-9.623 11.116,-8.613 ; U4.6 13.805,-4.379 13.615,-4.569 13.615,-5.16 12.958,-5.818 12.958,-6.821 12.868,-6.911 12.868,-7.4 12.583,-7.685 12.53,-7.685 12.149,-8.066 11.602,-8.613 11.386,-8.613 11.303,-8.613 11.116,-8.613
PA5_ON: R7.2 U1.11 U3.6 | length 12.1
  Top Layer w0.2: U3.6 8.331,-4.506 8.89,-5.065 9.413,-5.065 9.657,-5.309 10.663,-5.309 10.927,-5.573 12.324,-5.573 12.558,-5.807 12.558,-6.655 12.382,-6.831 12.358,-6.831 11.958,-7.231 R7.2 ; v1(10.396,-8.878) 10.456,-8.937 10.456,-9.528 10.903,-9.975 10.903,-10.374 11.446,-10.917 12.011,-10.917 U1.11 ; v1(11.276,-7.919) 11.276,-7.873 R7.2@11.918,-7.231
  Bottom Layer w0.2: v1(10.396,-8.878) 10.396,-8.838 11.276,-7.958 v1(11.276,-7.919)
PA6_ADC: C2.2 R2.1 R3.2 U1.12 | length 8.1
  Top Layer w0.2: R2.1@9.164,-7.739 9.734,-8.309 9.734,-9.372 10.503,-10.141 10.503,-10.54 11.347,-11.384 11.586,-11.384 11.978,-11.384 U1.12
  Top Layer w0.4: C2.2 R3.2 R2.1@9.164,-7.739
RTC_1.5V: C12.1 CON3.1 U2.6 | length 34.5
  Top Layer w0.2: U2.6 19.986,-11.292 19.636,-10.942 19.612,-10.942 19.436,-10.766 19.436,-10.018 19.787,-9.667 19.982,-9.667 20.699,-8.95 21.702,-8.95 22.083,-8.569 22.546,-8.569 23.042,-8.073 23.304,-8.073 C12.1
  Top Layer w0.3: v1(22.352,-7.762) 22.46,-7.762 22.593,-7.629 23.222,-7.629 23.475,-7.882 C12.1
  Bottom Layer w0.3: CON3.1 3.662,-3.81 4.907,-3.81 5.345,-3.372 17.962,-3.372 v1(22.352,-7.762)
SPI_CS: CON2.4 U1.28 | length 10.9
  Top Layer w0.2: U1.28 16.978,-11.884 17.477,-11.884 17.484,-11.878 17.663,-11.878 17.667,-11.874 18.224,-11.874 18.625,-12.275 18.625,-13.088 19.146,-13.609 v1(19.164,-13.609)
  Bottom Layer w0.2: v1(19.164,-13.609) 20.38,-13.609 20.747,-13.242 21.786,-13.242 21.913,-13.369 25.226,-13.369 25.81,-13.953 CON2.4
SPI_MOSI: CON2.1 U1.13 | length 33
  Top Layer w0.2: v1(10.758,-11.811) 10.831,-11.884 11.978,-11.884 U1.13
  Bottom Layer w0.2: v1(10.758,-11.811) 10.126,-12.443 10.126,-14.659 11.488,-16.021 12.846,-16.021 13.878,-17.053 16.834,-17.053 18.338,-18.557 19.039,-18.557 19.385,-18.211 20.455,-18.211 21.365,-17.301 26.397,-17.301 27.289,-16.409 27.289,-9.053 CON2.1
SPI_SCK: CON2.2 U1.26 | length 14.2
  Top Layer w0.2: U1.26 16.978,-12.984 17.478,-12.984 17.668,-13.174 17.699,-13.174 19.155,-14.629 20.657,-14.629 20.884,-14.856 20.895,-14.856 21.238,-15.199 22.942,-15.199 23.012,-15.129 24.114,-15.129 25.089,-14.154 25.089,-11.36 26.189,-10.26 CON2.2
STAT: R16.2 R17.2 U1.14 | length 11.6
  Top Layer w0.2: R17.2 R16.2 5.573,-7.739 5.73,-7.896 5.73,-8.163 6.034,-8.468 8.242,-8.468 10.033,-10.259 10.033,-12.005 10.489,-12.461 12.001,-12.461 U1.14
SWCLK: CON1.3 U1.24 | length 19.6
  Top Layer w0.2: U1.24 16.228,-14.294 16.278,-14.344 v1(17.385,-14.344) ; v1(21.405,-13.892) 21.501,-13.796 21.782,-13.796 22.44,-13.138 22.706,-13.138 23.364,-12.48 23.364,-11.238 23.514,-11.088 23.514,-10.317 24.384,-9.447 v1(24.384,-7.112)
  Bottom Layer w0.2: v1(17.385,-14.344) 20.938,-14.344 21.39,-13.892 v1(21.405,-13.892) ; CON1.3 25.764,-4.546 25.764,-6.539 25.191,-7.112 v1(24.384,-7.112)
SWDIO: CON1.2 U1.23 | length 22.4
  Top Layer w0.2: U1.23 15.735,-14.141 15.735,-14.987 v1(15.742,-14.994) ; v1(22.479,-14.019) 22.561,-14.019 22.98,-13.601 23.121,-13.601 23.764,-12.958 23.764,-11.403 23.914,-11.253 23.914,-10.483 25.034,-9.363 25.034,-6.111 v1(25.019,-6.096)
  Bottom Layer w0.2: v1(15.742,-14.994) 21.698,-14.994 22.041,-14.652 22.041,-14.5 22.479,-14.062 v1(22.479,-14.019) ; CON1.2 23.796,-4.578 24.983,-4.578 25.042,-4.636 25.364,-4.958 25.364,-5.615 25.019,-5.961 v1(25.019,-6.096)
UART_LOG: CON5.1 U1.20 | length 11.3
  Top Layer w0.2: U1.20 14.278,-14.184 14.278,-14.683 14.478,-14.883 14.664,-14.883 18.259,-18.478 18.259,-19.782 16.562,-21.479 CON5.1@15.138,-21.479
VBAT: C3.2 C7.2 C11.1 CON4.1 R12.2 U3.4 U3.5 U5.1 U5.3 U7.3 | length 41
  Top Layer w0.2: U5.3 1.976,-4.379 2.931,-5.334 6.238,-5.334 7.111,-4.461 7.111,-4.134 7.329,-3.916 7.341,-3.916 7.701,-3.556 U3.5
  Top Layer w0.381: U5.1 0.479,-2.542 0.891,-2.542 1.292,-2.943 1.292,-3.845 0.821,-4.316 0.479,-4.316 U5.3 0.416,-6.512 4.064,-10.16 R12.2 ; CON4.1 5.993,-21.566 5.993,-17.465 6.576,-16.882 6.769,-16.882 7.087,-16.563 U7.3 6.998,-15.329 6.471,-15.329 4.953,-13.811 4.953,-11.852 4.545,-11.443 4.417,-11.443 4.402,-11.429 4.194,-11.429 R12.2@4.084,-11.319 ; C7.2 6.459,-2.693 6.616,-2.693 6.703,-2.606 U3.4 U3.5 ; C11.1@6.622,-23.631 C11.1
  Top Layer w0.5: CON4.1@4.2,-23.631 C11.1@6.622,-23.631
VBUS_5V: C4.2 J1.A9 J1.B9 R13.1 R18.2 U7.4 | length 17.1
  Top Layer w0.2: v1(8.107,-12.34) 8.128,-12.361 8.128,-14.262 8.852,-14.986 8.89,-14.986 9.322,-15.418 U7.4
  Top Layer w0.3: U7.4 9.807,-15.547 10.34,-15.547 11.161,-16.368 11.161,-16.737 C4.2@11.295,-16.871 ; C4.2 11.295,-18.424 11.339,-18.468 11.339,-18.82 11.799,-19.28 11.799,-19.705 12.319,-20.225 v1(12.319,-20.32) 13.764,-20.32 14.379,-19.705 14.379,-19.5 14.609,-19.27 J1.A9@14.609,-19.094
  Bottom Layer w0.2: R13.1 7.132,-11.414 8.058,-12.34 v1(8.107,-12.34) ; R18.2 10.307,-21.344 11.331,-20.32 v1(12.319,-20.32)
VDD_SW: CON3.2 LS1.P R4.2 R5.2 R9.2 U4.1 | length 54.1
  Top Layer w0.2: v1(17.399,-5.207) 20.787,-5.207 v1(20.807,-5.228) ; 24.292,-17.053 26.645,-17.053 27.289,-16.409 27.289,-7.447 25.165,-5.323 24.81,-5.323 v1(24.714,-5.228)
  Top Layer w0.3: U4.1 16.683,-4.379 17.322,-5.018 17.322,-5.13 v1(17.399,-5.207) ; LS1.P 22.553,-20.375 23.003,-19.925 23.003,-19.225 24.384,-17.844 24.384,-17.145 24.292,-17.053 24.292,-16.455 24.116,-16.279 23.772,-16.279 R9.2
  Bottom Layer w0.2: v1(20.807,-5.228) v1(24.714,-5.228)
  Bottom Layer w0.3: CON3.2 5.142,-4.33 5.142,-4.282 5.552,-3.872 16.064,-3.872 v1(17.399,-5.207) 17.399,-5.235 18.395,-6.231 R5.2 18.419,-6.235 19.681,-6.235 R4.2
pads on no net: LS1.NC U1.2 U1.3 U1.7 U1.15 U1.18 U1.21 U1.22 U2.1 U3.3 U4.3 U5.4 U6.1

## Polygon pours and split planes (outlines as drawn)
GND on Bottom Layer "GND_L02_P001" (solid, remove dead copper, pour order 1): -1.93,-23.876 ccw(c0,-23.876) 0,-25.806 25.908,-25.806 ccw(c25.908,-23.876) 27.833,-24.018 27.838,-24.003 27.838,-1.778 27.833,-1.763 ccw(c25.908,-1.905) 26.05,0.02 26.035,0.025 0,0.025 ccw(c0,-1.905) -1.93,-1.905
GND on Top Layer "GND_L01_P000" (solid, remove dead copper, pour order 0): -1.93,-23.876 ccw(c0,-23.876) 0,-25.806 25.908,-25.806 ccw(c25.908,-23.876) 27.833,-24.018 27.838,-24.003 27.838,-1.778 27.833,-1.763 ccw(c25.908,-1.905) 26.05,0.02 26.035,0.025 0,0.025 ccw(c0,-1.905) -1.93,-1.905

## Silkscreen, mask and mechanical layers (free items; w line width, h text height)
Top Overlay:
  text "DESIGNED BY NIKA" at 16.383,-1.51 h1.25
  text "-" at 1.143,-21.94 h0.7
  text "+" at 3.937,-21.961 h0.7
Bottom Overlay:
  drawing of 1401 lines, arcs and shapes, not listed
  text "ONLY FOR TATO" at 12.827,-1.261 h0.8
Mechanical 1:
  lines w0.05: 25.908,0 cw(c25.908,-1.905) 27.813,-1.905 ; 26.035,0 0,0 ccw(c0,-1.905) -1.905,-1.905 -1.905,-23.876 ccw(c0,-23.876) 0,-25.781 25.908,-25.781 ccw(c25.908,-23.876) 27.813,-23.876 ; 27.813,-24.003 27.813,-1.778

## Text inside footprints (layer, text, board x,y; h text height)
U5: Top Overlay "*" at -0.156,-2.098 h1.27; Mechanical 13 "*" at 0.838,-3.19 h1.27